# Altium PCB Audio_Meter_V3.2.PcbDoc (part 4 of 4)
Units mil, origin at the board's own origin, x right, y up, seen from the top; angles counter-clockwise.
Board outline 2756.14 x 2519.69 mil, 2 copper layers (Top Layer, Bottom Layer), stack 57 mil thick; 102 components, 57 nets, 306 pads, 131 vias.
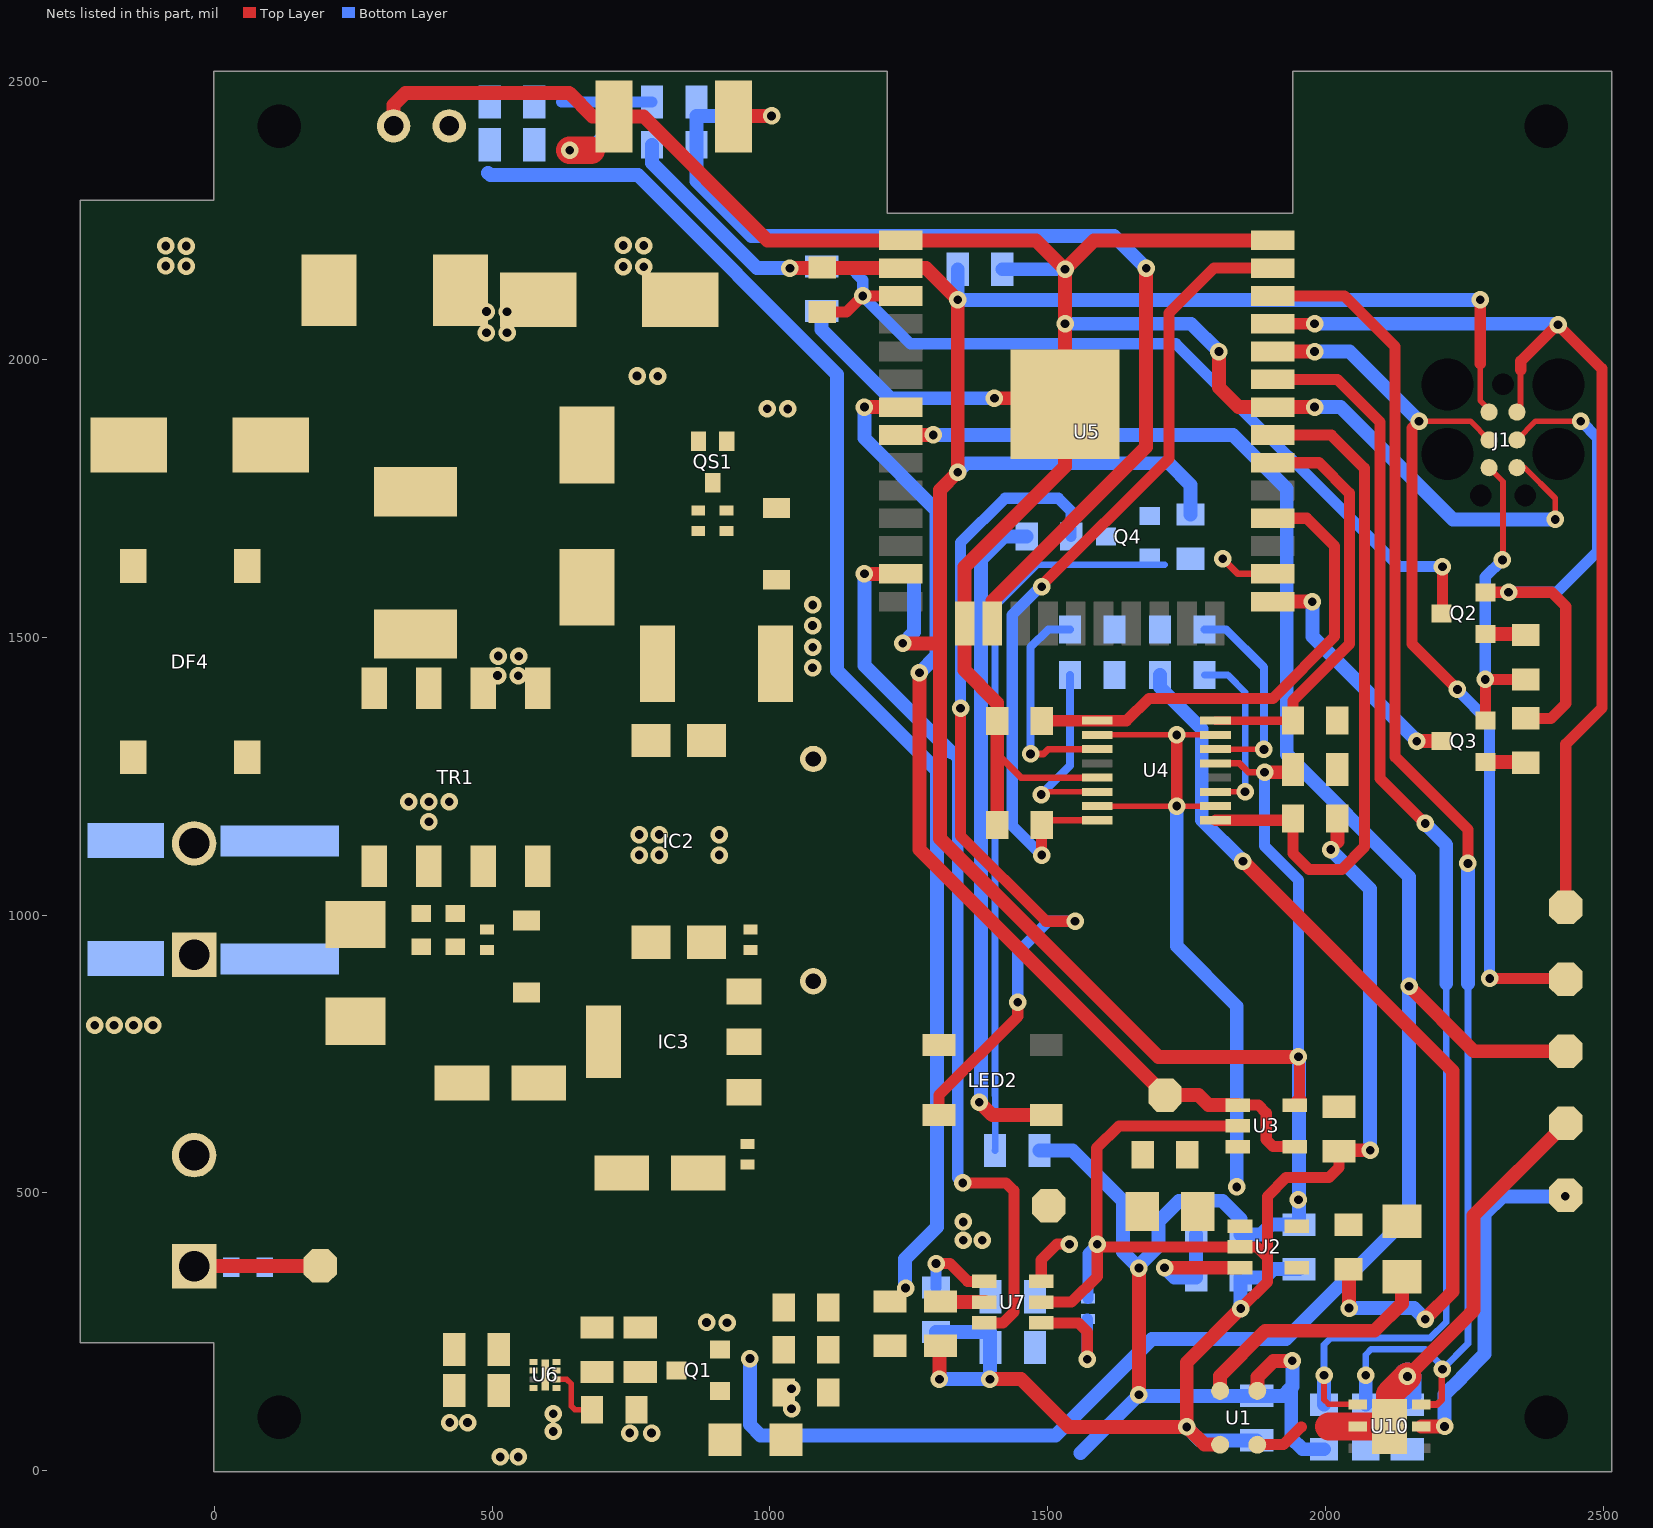
[diagram p2: the nets of this part, all layers, seen from the top]

## Part data (continued)
SW2: library part KSS221GLFS, "Tactile Switch SPST-NO Side Actuated Surface Mount, Right Angle", Contact Current Rating=50mA, Contact Resistance=100mR, Insulation Resistance=1GR, IP Rating=IP40, Manufacturer="ITT C&K", Max Operating Temperature=85°C, Max Voltage Rating (DC)=32V, Min Operating Temperature=-40°C, Operating Force=2N, Package Quantity=1, Power Rating=1W, Supplier Part Number 1=401-1097-6-ND, Actuator Length=0.8mm, ComponentLink1Description=https://datasheet.ciiva.com/26917/getdatasheetpartid-773364-26917575.pdf, ComponentLink1URL=https://datasheet.ciiva.com/26917/getdatasheetpartid-773364-26917575.pdf, ComponentLink2Description=https://datasheet.ciiva.com/30466/0900766b8129cd37-30466697.pdf, ComponentLink2URL=https://datasheet.ciiva.com/30466/0900766b8129cd37-30466697.pdf, ComponentLink3Description=https://datasheet.ciiva.com/16496/kss221g20lfs-16496166.pdf, ComponentLink3URL=https://datasheet.ciiva.com/16496/kss221g20lfs-16496166.pdf, ComponentLink4Description=https://datasheet.ciiva.com/18145/getdatasheetpartid-313005-18145235.pdf, ComponentLink4URL=https://datasheet.ciiva.com/18145/getdatasheetpartid-313005-18145235.pdf, ComponentLink5Description=https://datasheet.ciiva.com/16155/kss221glfs-ckcomponents-16155741.pdf, ComponentLink5URL=https://datasheet.ciiva.com/16155/kss221glfs-ckcomponents-16155741.pdf, ComponentLink6Description=https://datasheet.ciiva.com/5684/19445-5684460.pdf, ComponentLink6URL=https://datasheet.ciiva.com/5684/19445-5684460.pdf, ComponentLink7Description=https://datasheet.ciiva.com/2900/kss-2900345.pdf, ComponentLink7URL=https://datasheet.ciiva.com/2900/kss-2900345.pdf, ComponentLink8Description=https://datasheet.ciiva.com/2900/kss-2900343.pdf, ComponentLink8URL=https://datasheet.ciiva.com/2900/kss-2900343.pdf, ComponentLink9Description=https://datasheet.ciiva.com/7986/19445-7986997.pdf, ComponentLink9URL=https://datasheet.ciiva.com/7986/19445-7986997.pdf, ComponentLink10Description=https://datasheet.ciiva.com/2900/kss-2900344.pdf, ComponentLink10URL=https://datasheet.ciiva.com/2900/kss-2900344.pdf, Contact Material=Silver, Contact Plating=Silver, Current Rating=50mA, Depth=4.4mm, Illumination Type=Non-Illuminated,Illuminated, Lead Free="Lead Free", Length=4.5mm, Manufacturer Part Number=KSS221GLFS, Max Current Rating=50mA, Mechanical Life=100000Cycles, Mount="Surface Mount", Orientation="Right Angle", Packaging="Tape and Reel", Pricing 1="1=0.68, 10=0.655, 25=0.6424, 50=0.6182, 100=0.5334, 250=0.4849, 500=0.4607, 1000=0.3637 (USD)", Radiation Hardening=No, REACH SVHC="No SVHC", Stock 1=17242, Supplier 1=Digi-Key, Switch Function=Off-Mom, Switch Travel=0.3mm, Termination="Gull Wing", Throw Configuration=SPST, Voltage Rating (DC)=32V, Width=7mm
TR1: "FLYBACK TRANSFORMER WE-FB", Frequency=300kHz, Manufacturer="Wurth Electronics Midcom", Max Operating Temperature=125°C, Min Operating Temperature=-40°C, Package Quantity=300, Supplier Part Number 1=1297-1004-1-ND, Category=Transformers, ComponentLink1Description=https://datasheet.ciiva.com/18573/750311558-18573660.pdf?src-supplier=Digi-Key, ComponentLink1URL=https://datasheet.ciiva.com/18573/750311558-18573660.pdf?src-supplier=Digi-Key, Height - Seated (Max)=10.54mm, Length=9.78mm, Manufacturer Part Number=750311558, Mount="Surface Mount", Packaging="Tape and Reel", Pricing 1="1=6.21000, 10=6.13300, 50=5.74900, 100=5.17400 (USD)", RoHS=Yes, Stock 1=478, Supplier 1=Digi-Key, Width=9.14mm
U1: "SPU-TOP MIC IOT FOCUSED MIC", Manufacturer=Knowles, Operating Supply Current=250uA, Operating Supply Voltage=3.6V, Package Quantity=1200, Supplier Part Number 1=423-1138-1-ND, ComponentLink1Description=https://media.digikey.com/pdf/Data%20Sheets/Knowles%20Acoustics%20PDFs/SiSonic_Design_Guide.pdf?src-supplier=Mouser, ComponentLink1URL=https://media.digikey.com/pdf/Data%20Sheets/Knowles%20Acoustics%20PDFs/SiSonic_Design_Guide.pdf?src-supplier=Mouser, ComponentLink2Description=https://media.digikey.com/pdf/Data%20Sheets/Knowles%20Acoustics%20PDFs/SiSonic_Design_Guide.pdf?src-supplier=Digi-Key, ComponentLink2URL=https://media.digikey.com/pdf/Data%20Sheets/Knowles%20Acoustics%20PDFs/SiSonic_Design_Guide.pdf?src-supplier=Digi-Key, Depth=1.2mm, Direction=Omnidirectional, Height=1.2mm, Impedance=300R, Length=3.76mm, Manufacturer Part Number=SPU0410HR5H-PB, Output Type=Analog, Packaging="Tape and Reel", Pricing 1="1=0.82, 10=0.688, 25=0.6376, 50=0.6006, 100=0.5649, 500=0.48696 (USD)", Shape=Rectangular, Signal to Noise Ratio (SNR)=59dB, Stock 1=83682, Supplier 1=Digi-Key, Termination=SMD/SMT, Voltage Rating=3.6V, Width=2.95mm
U2 U3: "IC OPAMP GP 1 CIRCUIT SOT23-5", Case/Package=SOT-23, Input Bias Current=10pA, Input Offset Voltage (Vos)=1mV, Manufacturer="Texas Instruments", Max Operating Temperature=85°C, Max Supply Voltage=5.5V, Min Operating Temperature=-40°C, Min Supply Voltage=2.7V, Nominal Supply Current=250uA, Output Current per Channel=15mA, Package Quantity=250, Power Supply Rejection Ratio (PSRR)=90.46dB, Quiescent Current=250mA, Supplier Part Number 1=OPA344NACT-ND, Voltage Gain=122dB, Bandwidth=1MHz, Common Mode Rejection Ratio=76dB, ComponentLink1Description=http://www.ti.com/general/docs/lit/getliterature.tsp?genericPartNumber=OPA344&fileType=pdf&src-supplier=Newark, ComponentLink1URL=http://www.ti.com/general/docs/lit/getliterature.tsp?genericPartNumber=OPA344&fileType=pdf&src-supplier=Newark, ComponentLink2Description=http://www.farnell.com/datasheets/1882856.pdf?src-supplier=Element14, ComponentLink2URL=http://www.farnell.com/datasheets/1882856.pdf?src-supplier=Element14, ComponentLink3Description=http://www.ti.com/lit/ds/symlink/opa344.pdf?src-supplier=Digi-Key, ComponentLink3URL=http://www.ti.com/lit/ds/symlink/opa344.pdf?src-supplier=Digi-Key, ComponentLink4Description=http://focus.ti.com/lit/ds/symlink/opa344.pdf?src-supplier=Avnet+Europe, ComponentLink4URL=http://focus.ti.com/lit/ds/symlink/opa344.pdf?src-supplier=Avnet+Europe, ComponentLink5Description=http://www.ti.com/general/docs/lit/getliterature.tsp?genericPartNumber=OPA4345&&fileType=pdf&src-supplier=Avnet, ComponentLink5URL=http://www.ti.com/general/docs/lit/getliterature.tsp?genericPartNumber=OPA4345&&fileType=pdf&src-supplier=Avnet, Gain Bandwidth Product=1MHz, Height=1.15mm, Lead Free="Lead Free", Length=2.9mm, Manufacturer Part Number=OPA344NA/250, Max I/O Voltage=1mV, Number of Amplifiers=1, Number of Channels=1, Number of Circuits=1, Number of Elements=1, Number of Pins=5, Packaging="Tape and Reel", Pricing 1="1=1.59, 10=1.43, 25=1.3492, 100=1.0794 (USD)", Radiation Hardening=No, REACH SVHC="No SVHC", Slew Rate=0.8V/µs, Stock 1=6132, Supplier 1=Digi-Key, Unity Gain Bandwidth Product=1MHz, Width=1.6mm
U4: "IC SWITCH QUAD SPST 16TSSOP", Case/Package=TSSOP, High Level Output Current=30mA, Manufacturer="Analog Devices", Max Operating Temperature=85°C, Max Power Dissipation=5uW, Max Supply Current=1uA, Max Supply Voltage=5.5V, Min Operating Temperature=-40°C, Min Supply Voltage=1.8V, On-State Resistance=4R, Operating Supply Current=1nA, Package Quantity=1, Power Dissipation=430mW, Supplier Part Number 1=ADG712BRUZ-REELCT-ND, -3db Bandwidth=200MHz, Bandwidth=200MHz, ComponentLink1Description=http://www.analog.com/media/en/technical-documentation/data-sheets/ADG711_712_713.pdf?src-supplier=Digi-Key, ComponentLink1URL=http://www.analog.com/media/en/technical-documentation/data-sheets/ADG711_712_713.pdf?src-supplier=Digi-Key, ComponentLink2Description=http://datasheet.iiic.cc/analog_devices/ADG712BRUZ-REEL.pdf?src-supplier=IIIC, ComponentLink2URL=http://datasheet.iiic.cc/analog_devices/ADG712BRUZ-REEL.pdf?src-supplier=IIIC, Contact Plating=Tin,Matte, Interface=Parallel, Lead Free="Contains Lead", Manufacturer Part Number=ADG712BRUZ-REEL, Mount="Surface Mount", Number of Bits=4, Number of Channels=4, Number of Circuits=4, Number of Inputs=4, Number of Outputs=4, Number of Pins=16, Packaging="Tape and Reel", Polarity=Non-Inverting, Pricing 1="1=2.89, 10=2.598, 25=2.4564, 100=2.129, 250=2.01984, 500=1.81238, 1000=1.52852 (USD)", Stock 1=4085, Supplier 1=Digi-Key, Supply Type=Single, Throw Configuration=SPST, Turn-Off Delay Time=6ns, Turn-On Delay Time=11ns
U5: "WIFI MODULE 128MBITS SPI FLASH", Case/Package=SMD/SMT, Frequency=2.5GHz, Manufacturer="Espressif Systems", Manufacturer Part Number=ESP32-WROOM-32D(16MB), Max Operating Temperature=85°C, Min Operating Temperature=-40°C, Supplier Part Number 1=356-ES32WROOM32D16MB, ComponentLink1Description=https://www.espressif.com/sites/default/files/documentation/esp32-wroom-32d_esp32-wroom-32u_datasheet_en.pdf?src-supplier=Digi-Key, ComponentLink1URL=https://www.espressif.com/sites/default/files/documentation/esp32-wroom-32d_esp32-wroom-32u_datasheet_en.pdf?src-supplier=Digi-Key, Data Rate=150Mbps, Interface=I2C,SPI,GPIO,PWM,SDIO,UART, Memory Size=536KB, Mount="Surface Mount", Packaging="Tape and Reel", Pricing 1="1=4.5, 5=4.5 (USD)", Sensitivity=-98dBm, Stock 1=3620, Supplier 1=Mouser
U6: "IC REG LINEAR 3.3V 1A 8XDFN", Dropout Voltage=95mV, Manufacturer="ON Semiconductor", Max Operating Temperature=125°C, Min Current Limit=1.1A, Min Operating Temperature=-40°C, Output Current=1A, Output Voltage=3.3V, Supplier Part Number 1=NCP186AMX330TAGOSCT-ND, ComponentLink1Description=http://www.farnell.com/datasheets/2236905.pdf?src-supplier=Farnell, ComponentLink1URL=http://www.farnell.com/datasheets/2236905.pdf?src-supplier=Farnell, ComponentLink2Description=http://www.farnell.com/datasheets/2236905.pdf?src-supplier=Newark, ComponentLink2URL=http://www.farnell.com/datasheets/2236905.pdf?src-supplier=Newark, ComponentLink3Description=http://www.onsemi.com/pub/Collateral/NCP186-D.PDF?src-supplier=Digi-Key, ComponentLink3URL=http://www.onsemi.com/pub/Collateral/NCP186-D.PDF?src-supplier=Digi-Key, ComponentLink4Description=https://www.onsemi.com/pub/Collateral/NCP186-D.PDF?src-supplier=Digi-Key, ComponentLink4URL=https://www.onsemi.com/pub/Collateral/NCP186-D.PDF?src-supplier=Digi-Key, Lead Free="Lead Free", Manufacturer Part Number=NCP186AMX330TAG, Mount="Surface Mount", Number of Pins=8, Number of Regulators=1, Packaging="Tape and Reel", Pricing 1="1=0.48, 10=0.39, 25=0.3564, 100=0.2405, 250=0.199, 500=0.18242, 1000=0.13682 (USD)", Stock 1=5995, Supplier 1=Digi-Key
U7: "IC BAT CHG LI-ION 1 CELL SOT23-6", Battery Pack Voltage=4.2V, Case/Package=SOT-23-6, Manufacturer="Texas Instruments", Max Charge Current=800mA, Max Operating Temperature=125°C, Max Supply Voltage=6.45V, Min Operating Temperature=0°C, Supplier Part Number 1=296-47315-1-ND, ComponentLink1Description=http://www.ti.com/lit/ds/symlink/bq21040.pdf?src-supplier=Digi-Key, ComponentLink1URL=http://www.ti.com/lit/ds/symlink/bq21040.pdf?src-supplier=Digi-Key, ComponentLink2Description=http://www.ti.com/general/docs/suppproductinfo.tsp?distId=10&gotoUrl=http%3A%2F%2Fwww.ti.com%2Flit%2Fgpn%2Fbq21040&src-supplier=Digi-Key, ComponentLink2URL=http://www.ti.com/general/docs/suppproductinfo.tsp?distId=10&gotoUrl=http%3A%2F%2Fwww.ti.com%2Flit%2Fgpn%2Fbq21040&src-supplier=Digi-Key, ComponentLink3Description=http://www.ti.com/general/docs/suppproductinfo.tsp?distId=10&amp;gotoUrl=http%3A%2F%2Fwww.ti.com%2Flit%2Fgpn%2Fbq21040&src-supplier=Digi-Key, ComponentLink3URL=http://www.ti.com/general/docs/suppproductinfo.tsp?distId=10&amp;gotoUrl=http%3A%2F%2Fwww.ti.com%2Flit%2Fgpn%2Fbq21040&src-supplier=Digi-Key, Differential Output=No, Fault Protection="Over Voltage,Over Temperature,Short Circuit", Interface=USB,SPI, Lead Free="Lead Free", Manufacturer Part Number=BQ21040DBVR, Mount="Surface Mount", Number of Bits=16, Number of Cells=1, Number of D/A Converters=4, Output Type="Analog Current/Voltage", Packaging="Cut Tape", Pricing 1="1=1.14, 10=1.015, 100=0.7396, 500=0.61924, 1000=0.48163 (USD)", Settling Time=30us, Stock 1=5958, Supplier 1=Digi-Key
U10: "SENS HUMID/TEMP 3.6V I2C 2% 6DFN", Manufacturer="Silicon Labs", Max Operating Temperature=85°C, Min Operating Temperature=-40°C, Supplier Part Number 1=336-4380-1-ND, Accuracy=3%, ComponentLink1Description=https://www.silabs.com/Support%20Documents/TechnicalDocs/Si7021-A20.pdf?src-supplier=Avnet, ComponentLink1URL=https://www.silabs.com/Support%20Documents/TechnicalDocs/Si7021-A20.pdf?src-supplier=Avnet, ComponentLink2Description=https://www.silabs.com/documents/public/data-sheets/Si7021-A20.pdf?src-supplier=Newark, ComponentLink2URL=https://www.silabs.com/documents/public/data-sheets/Si7021-A20.pdf?src-supplier=Newark, ComponentLink3Description=https://www.silabs.com/Support%20Documents%2fTechnicalDocs%2fSi7021-A20.pdf?src-supplier=Digi-Key, ComponentLink3URL=https://www.silabs.com/Support%20Documents%2fTechnicalDocs%2fSi7021-A20.pdf?src-supplier=Digi-Key, ComponentLink4Description=https://www.silabs.com/Support%20Documents/TechnicalDocs/Si7021-A20.pdf?src-supplier=Avnet+Asia, ComponentLink4URL=https://www.silabs.com/Support%20Documents/TechnicalDocs/Si7021-A20.pdf?src-supplier=Avnet+Asia, ComponentLink5Description=https://www.silabs.com/documents/public/data-sheets/Si7021-A20.pdf?src-supplier=Digi-Key, ComponentLink5URL=https://www.silabs.com/documents/public/data-sheets/Si7021-A20.pdf?src-supplier=Digi-Key, ComponentLink6Description=https://www.silabs.com/documents/public/data-sheets/Si7021-A20.pdf?src-supplier=Farnell, ComponentLink6URL=https://www.silabs.com/documents/public/data-sheets/Si7021-A20.pdf?src-supplier=Farnell, Manufacturer Part Number=SI7021-A20-GM1R, Mount="Surface Mount", Output Type=I2C,Digital, Pricing 1="1=3.37, 25=3.2436, 100=3.2313 (USD)", Response Time=18s, Sensor Type=Temperature, Stock 1=8770, Supplier 1=Digi-Key

## Free pads (board coordinates)
  round 60 hole 78.74 unplated: MH2(117.11,96.43) MH3(117.11,2419.26) MH3(2396.87,96.43) MH3(2396.87,2419.26)

## Via types
v1: diameter 31.5, hole 15.75, Top Layer to Bottom Layer, 72 vias
v2: diameter 31.5, hole 15.75, Top Layer to Bottom Layer, tented both sides, 59 vias

## Nets (pads, with @x,y where several pads share a name; then routed paths per layer and width w, separated by ;. In a path a pad name is that pad's centre, name@x,y a point inside that pad or via, vN(x,y) a via of type N, cw(c..) or ccw(c..) an arc to the next point about the centre after c; other vN are vias at no path point)
3V3: C1.1 C2.1 C3.1 C4.1 C7.1 C12.1 C13.1 C22.1 C76.2 J1.1 P4.1 Q4.1 R2.2 R4.2 R5.2 R24.2 R43.2 R56.1 RC1.2 U1.1 U2.5 U3.5 U4.13 U5.2 U6.1 U6.2 U6.4 U10.5 | length 7769.1
  Top Layer w10: 2278,1992 2277.75,1991.75 2277.75,1926.25 2294,1910 J1.1@2294,1905
  Top Layer w12: U4.13@1801.65,1273.02 1844.98,1273.02 1861,1257 v2(1890,1257)
  Top Layer w20: U3.5@1953,667.08 v2@1953,745 ; 2278,1992 v2(2278,2107)
  Top Layer w25: v2(1036,2164) U5.2@1235.35,2164 1281,2164 v2(1338,2107) v1(1338,1797) 1306,1765 1306,1488 ; v1(1239,1489) 1305,1489 1306,1488 ; v2(1664,137) v2(1664,365) ; 1793,745 1699,745 1306,1138 1306,1488 ; 1796,745 v2(1951,745) ; U1.1@1875.82,151.47 1875.82,145.18 U1.1@1877,144 1877,169 1906,198 v2(1940,198) ; v2(1890,1257) 1936,1257 C1.1@1941,1262 ; U3.5@1944.18,658.26 U3.5@1953,667.08 ; U10.5@2172.17,80 v1(2214,80)
  Bottom Layer w20: v2@1890,1255 1890,1124 1951,1063 v2(1951,745)
  Bottom Layer w25: R24.2@788,2386 788,2353 977,2164 v2(1036,2164) ; v1(1239,1489) 1259.5,1509.5 RC1.2@1259.5,1615 ; v1(1338,1797) 1354,1813 1718,1813 1757,1774 R56.1@1757,1721 ; C22.1@1338,2162 v2(1338,2107) v2(2278,2107) ; C76.2@1485,576.37 1544.63,576.37 1635,486 1635,394 v2(1664,365) 1664,369.45 1699,404.45 1699,449 1736,486 1814,486 1847,453 R2.2@1847,425 1884,425 1902,443 C3.1@1952,443 v2@1952,488 ; 1559,32 v2(1664,137) 1666,135 C4.1@1876,135 1923,135 1938,150 ; v2(1940,198) 1940,152 1938,150 ; v2(1951,488) v2@1952,488 ; v2@1952,744 v2@1952,488 ; R4.2@1997,39 1958,39 1938,59 1938,150 ; v1(2214,80) 2214,137.15 2245.25,168.4 2245.25,169.25 2286,210 2286,462 2318,494 v1(2431,494)
  other v1: 515,25 547,25
#12-P: R8.2 U4.1 U5.28 | length 885
  Top Layer w20: R8.2@1489,1349 1489.8,1349.8 U4.1@1589.05,1349.8 1641.8,1349.8 1682,1390 1905,1390 2016,1501 2016,1664 1966,1714 U5.28@1904.65,1714
#12-S: R7.1 U4.3 | length 402.7
  Top Layer w12: v2(1469,1290) 1492.39,1290 1501,1298.61 U4.3@1589.05,1298.61
  Bottom Layer w12: v2(1469,1290) v2@1471,1292
  Bottom Layer w15: v2(1469,1290) 1469,1482 1501,1514 R7.1@1540,1514
#13-P: R10.2 U4.16 U5.30 | length 751.8
  Top Layer w15: U4.16@1801.65,1349.8 1940.8,1349.8 R10.2@1941,1350
  Top Layer w20: U5.30@1904.65,1814 1988,1814 2043,1759 2043,1488 1941,1386 R10.2@1941,1350
#13-S: R9.1 U4.14 | length 372.5
  Top Layer w10: U4.14@1799.65,1298.61 v2@1889,1298.61
  Bottom Layer w15: R9.1@1782,1514 1821,1514 1889,1446 v2(1889,1298)
#14-P: R12.2 U4.9 U5.31 | length 1232.9
  Top Layer w20: U4.9@1801.65,1170.66 1937.66,1170.66 R12.2@1941,1174 1941,1111 1970,1082 2029,1082 2070,1123 2070,1804 2010,1864 U5.31@1904.65,1864
#14-S: R11.1 U4.11 | length 318.4
  Top Layer w10: U4.11@1801.65,1221.84 v2(1855,1221.84)
  Bottom Layer w12: R11.1@1782,1432 1824,1432 1855,1401 v2(1855,1221.84)
#15-P: R14.2 U4.8 U5.37 | length 1491.6
  Top Layer w12: R14.2@1497.66,1170.66 U4.8@1589.05,1170.66
  Top Layer w20: v2@1488,1592 1718,1822 1718,2083 1799,2164 U5.37@1904.65,2164 ; v2(1489,1108) R14.2@1489,1162 R14.2@1497.66,1170.66
  Bottom Layer w20: v2@1488,1592 1435.98,1539.98 1435.98,1161.02 v2(1489,1108)
  other v2: 1489,1591
#15-S: R13.1 U4.6 | length 339.6
  Top Layer w10: v2(1488,1217) 1492.84,1221.84 U4.6@1589.05,1221.84
  Bottom Layer w15: v2(1488,1217) 1540,1269 R13.1@1540,1432
#_OUT_MIC: R1.2 R7.2 R9.2 R11.2 R13.2 U2.4 | length 1613
  Top Layer w25: v2(1851,1097) 2228.63,719.37 2228.63,322.63 v2(2179,273) ; v2(2042,293) R1.2@2042,365
  Bottom Layer w25: R11.2@1702,1432 1702,1410 1777,1335 1777,1171 v2(1851,1097) ; v2@2044,293 2159,293 v2(2179,273)
#O_MIC: P9.1 U3.1 U3.4 U5.7 | length 1852.8
  Top Layer w20: U3.1@1841.82,658.26 1878.74,658.26 1893,644 1893,596 1905.55,583.45 U3.4@1944.18,583.45
  Top Layer w25: v1(1170,1914) U5.7@1235.35,1914 ; v1(1269,1436) 1269,1118 P9.1@1711,676 1771,676 1788.74,658.26 U3.1@1841.82,658.26
  Bottom Layer w25: v1(1170,1914) 1170,1858 1300,1728 1300,1467 v1(1269,1436)
#OUT_MIC: C9.1 U2.1 U4.2 U4.7 U4.10 U4.15 | length 1283.1
  Top Layer w10: U4.7@1589.05,1196.25 v2(1732,1196.25) U4.10@1801.65,1196.25 ; U4.2@1589.05,1324.2 v2(1732,1324.2) U4.15@1801.65,1324.2
  Top Layer w20: v2(1732,1196.25) v2(1732,1324.2)
  Bottom Layer w25: v2(1732,1196.25) 1732,944 1840,836 v2(1840,511)
AC1: CF8.2 J7.2 RF12.1
AC2: CF8.1 DF4.2 J7.1
B_ADC: P8.1 R32.1 R33.1 U5.8 | length 3940.9
  Top Layer w25: U5.8@1235.35,1864 v1(1294,1864) ; v1(2150,872) 2267,755 P8.1@2432,755
  Bottom Layer w25: v1(964,202) 964,83 983,64 1514,64 1687.6,237.6 1928.6,237.6 2150,459 v1(2150,872) 2150,1069 1930,1289 1930,1767 1833,1864 v1(1294,1864)
BATT_IN: C16.1 C17.1 C24.1 C26.1 J5.1 Q1.3 R32.2 U7.2 | length 2601
  Top Layer w25: C17.1@1307,306 1309.4,303.6 U7.2@1385.82,303.6
  Bottom Layer w25: 493,2335.5 497,2331.5 762.5,2331.5 1121,1973 1121,1440 1301,1260 1301,439 1243,381 1243,330 v1(1244,329)
BR#: DF4.4 RF12.2
  other v1: -215,802 -180,802 -145,802 -110,802
BYP#: CF7.1 D3.2 RF7.1
CHG: RC1.1 U5.13 U7.3 | length 1611.9
  Top Layer w20: v1(1347,518) 1425,518 1439,504 1439,286 1419.2,266.2 U7.3@1385.82,266.2
  Top Layer w25: v1(1170,1614) U5.13@1235.35,1614
  Bottom Layer w20: 1325.5,1293.5 1338,1281 1338,527 v1(1347,518)
  Bottom Layer w25: v1(1170,1614) 1170,1449 1325.5,1293.5
DTR: J1.5 Q3.2 RC2.1 | length 551.8
  Top Layer w10: J1.5@2294,1805 2319,1780 2319,1640 v2(2318,1639)
  Top Layer w20: Q3.2@2287.37,1350.4 2287.37,1424 RC2.1@2360,1424 RC2.1@2361,1424
  Bottom Layer w20: v2(2287,1424) 2287,1608 v2(2318,1639)
ENABLE: C78.1 Q2.3 R43.1 U5.3 | length 1596.5
  Top Layer w20: R43.1@1094,2085 1138,2085 v2(1167,2114) U5.3@1235.35,2114 ; Q2.3@2208.63,1543 2210,1544.37 v2(2210,1627) ; v2@2214,1627 v2@2214.63,1626.37
  Bottom Layer w20: C78.1@1093,2167 1143,2167 1167,2143 v2(1167,2114) 1253,2028 1731,2028 2132,1627 v2(2210,1627)
FB_: CF4.1 IC2.4 IC3.2
GND: C1.2 C2.2 C3.2 C4.2 C7.2 C10.2 C11.2 C12.2 C13.2 C16.2 C17.2 C18.2 C19.2 C22.2 C24.2 C25.2 C26.2 C78.2 CF3.2 CF9.2 IC2.2 J1.6 J5.2 J6.2 LED2.1 P5.1 R3.2 R8.1 R10.1 R12.1 R14.1 R26.1 R28.1 R29.1 R33.2 RF8.2 SW2.2 TR1.7 TR1.8 U1.2 U1.3 U2.2 U3.2 U4.5 U5.1 U5.15 U5.32 U5.38 U5.39 U6.5 U6.9 U7.5 U10.2 U10.7 | length 9590.2
  Top Layer w10: J1.6@2344,1805 2358,1805 2413,1750 v2(2413,1712)
  Top Layer w12: 1409,1286 1413,1286 1451.57,1247.43 U4.5@1589.05,1247.43
  Top Layer w20: U7.5@1488.18,303.6 1542.97,303.6 1589,349.63 v2(1589,408) ; U5.39@1520.31,1930 U5.39@1531,1919.31 ; U3.2@1841.82,620.86 1627.86,620.86 1588,581 1588,409 v2(1589,408) ; v2(1847,292) 1895,340 1895,384 ; U1.2@1877,47.15 1924.15,47.15 1956,79 ; C2.2@2024,575 2024,546 2006,528 1928.96,528 1895,494.04 1895,384 ; v2(1589,408) 1594,403 U2.2@1845.82,403 1876,403 1895,384
  Top Layer w25: J5.2@323,2420 323,2458 344,2479 639,2479 681,2437 SW2.2@719.7,2437 773,2437 996,2214 U5.1@1235.35,2214 1479,2214 v2(1531,2162) ; v2(1305,165) 1305,223 C17.2@1307,225 ; v2(1396,165) 1452,165 1538,79 v2(1750,79) ; v1(1404,1930) U5.39@1520.31,1930 ; R14.1@1409,1162 1409,1286 R8.1@1409,1349 1409,1382 1350.31,1440.69 U5.15@1350.31,1524.63 1350.31,1626.31 1531,1807 U5.39@1531,1919.31 v2(1531,2064) 1530,2065 1531,2066 v2(1531,2162) ; v2(1808,2014) 1808,1949 1843,1914 U5.32@1904.65,1914 v2(1980,1914) ; U1.3@1810.07,47.15 1781.85,47.15 v2(1750,79) ; v2(1847,292) 1750,195 v2(1750,79) ; U5.38@1904.65,2214 1583,2214 v2(1531,2162) ; 2021,1132.41 R12.1@2021,1174 ; C2.2@2024,575 2026,577 v2@2076,577 ; v1(2147,170) 2266,289 2266,459.5 P5.1@2432,625.5
  Top Layer w50: v2(640,2376) 678,2376 ; 2006,80 U10.2@2058,80 U10.7@2115.09,80 2115.09,138.09 v1(2147,170)
  Bottom Layer w20: 625,2463 C25.2@788,2463 ; R28.1@1572,310.5 1572,391 v2(1589,408)
  Bottom Layer w25: v2(640,2376) 675,2376 724,2425 ; C78.2@1093,2087 1093,2053.34 1216.34,1930 v1(1404,1930) ; R29.1@1299,250 1396,250 v2(1396,165) v2(1305,165) ; C22.2@1418,2162 v2@1530,2162 ; v2(1531,2064) 1758,2064 v2(1808,2014) ; v2(1750,79) 1774,55 C4.2@1876,55 ; v2@1847,293 R3.2@1847,348 1891,348 1906,363 C3.2@1952,363 ; v2(1980,1914) 2027,1914 2229,1712 v2(2413,1712) ; v2(2009,1118) 2080,1047 v2(2080,577)
  Bottom Layer w50: C7.2@2147,136 v1(2147,170)
  other v1: 610,71 424,87 456,87 610,103 510,1431 547,1430.7 511,1466 548,1465.7 995,1911 1032,1910.7 761,1970 798,1969.7
  other v2: 1348,415 1382,415 1348,448
GND_VAC: C5.2 CF3.1 CF4.2 CF7.2 CF10.2 CF11.2 DF4.3 IC2.3 IC3.4 TR1.1
  other v1: 764.7,1108 800.7,1108 908.7,1108 765,1145 801,1145 909,1145 736,2167 773,2166.7 -87,2168 -50,2167.7 -87,2204 -50,2203.7 736,2205 773,2204.7
IND#: CF10.1 DF4.1 L1.1
IO_0: Q3.3 U5.25 | length 447.1
  Top Layer w10: v2@2164,1311 v2@2166,1313
  Top Layer w25: U5.25@1904.65,1564 v2(1976,1564) ; v2@2166,1313 Q3.3@2208.63,1313
  Bottom Layer w25: v2(1976,1564) 1976,1501 v2(2164,1313) ; v2@2163,1312 v2@2164,1311
IO_4: LED2.2 Q4.3 R57.2 | length 1563.1
  Top Layer w20: LED2.2@1304.16,640.02 1304.16,676.16 1446,818 v1(1446,843) ; v1(1343,1372) 1343,1142.72 1496.72,989 v1(1549,989)
  Bottom Layer w20: v1(1343,1372) 1343,1670 1423,1750 1519,1750 1542,1727 R57.2@1542,1681 ; v1(1446,843) 1446,934 1501,989 v1(1549,989)
IO_4#: C76.1 Q4.2 R56.2 U5.26 | length 1416
  Top Layer w12: v1(1815,1641) 1842,1614 U5.26@1904.65,1614
  Bottom Layer w12: C76.1@1405,576.37 1405.25,576.61 1405.25,675.41 1405,675.66 1405,1554 1481.6,1630.6 1710.6,1630.6
ISET: R28.2 U7.4 | length 211
  Top Layer w20: U7.4@1488.18,266.2 1554.8,266.2 1571,250 v2(1571,201)
  Bottom Layer w20: v2(1571,201) R28.2@1571,273.5
NetC8_2: C8.2 R1.1
NetC9_2: C9.2 R6.2
NetCF1_1: CF1.1 D1.2 RF2.2
NetD2_1: D2.1 QS1.3 RF8.1 RF11.1
NetD3_1: D3.1 RF6.2
NetQ2_1: Q2.1 RC2.2 | length 68.3
  Top Layer w10: RC2.2@2359.4,1505.6 RC2.2@2361,1504
  Top Layer w25: Q2.1@2293.37,1505.6 RC2.2@2359.4,1505.6
NetQ3_1: Q3.1 RC3.2 | length 73.3
  Top Layer w10: RC3.2@2358.4,1275.6 RC3.2@2360,1274
  Top Layer w25: Q3.1@2287.37,1275.6 RC3.2@2358.4,1275.6
NetR2_1: R2.1 R3.1 U2.3 | length 277.1
  Top Layer w25: v2(1710,365.6) U2.3@1845.82,365.6
  Bottom Layer w25: v2(1710,365.6) 1727.6,348 R3.1@1767,348 R2.1@1767,425
NetR6_1: R6.1 U3.3
NetR39_1: R39.1 U6.6 | length 109.9
  Top Layer w10: U6.6@616.34,164.75 634.51,164.75 642.67,156.59 642.67,116.33 649,110 R39.1@680,110
OPT_: IC2.1 RF11.2
OUT_MIC: C8.1 U1.4 | length 455.8
  Top Layer w25: U1.4@1810.07,144 1810.07,171.07 1891.16,252.16 2088.16,252.16 2137,301 C8.1@2137,349
PRI_1: CF1.2 CF11.1 L1.2 RF2.1 TR1.3
  other v1: 386.5,1168 350,1204 386.5,1204 423,1204 490,2048 527,2047.7 490,2086 527,2085.7
PRI_2: D1.1 IC3.3 TR1.4
PRI_3: RF6.1 TR1.2
PRI_4: DF1.1 TR1.5 TR1.6
PW_: C5.1 IC3.1 RF7.2
QOUT: CF9.1 DF1.2 QS1.2 RF10.1
RTS: J1.4 Q2.2 RC3.1 | length 1017.9
  Top Layer w10: J1.4@2344,1855 2377.75,1888.75 v2(2459,1888.75) v2@2468,1888.75
  Top Layer w20: v2@2329,1580.4 2293.37,1580.4 2293.97,1581 v2(2329,1581) 2406,1581 2432,1555 2432,1381 2405,1354 RC3.1@2360,1354
  Bottom Layer w20: v2(2329,1581) 2416,1581 2489,1654 2489,1858.75 v2(2459,1888.75)
RX: J1.3 P7.1 U5.34 | length 1658.8
  Top Layer w10: v2(2168,1888.75) 2260.25,1888.75 J1.3@2294,1855 ; P7.1@2430.5,886 P7.1@2432,884.5
  Top Layer w20: v2(2168,1888.75) 2155.25,1876 2155.25,1487.75 v2(2237,1406) ; v2(2295,886) P7.1@2430.5,886
  Top Layer w25: U5.34@1904.65,2014 v2(1980,2014)
  Bottom Layer w20: v2(2237,1406) 2237,1405 2295,1347 v2(2295,886)
  Bottom Layer w25: v2(1980,2014) 2042.75,2014 v2(2168,1888.75)
SCL_: R5.1 U5.36 U10.6 | length 2519.2
  Top Layer w12: U10.6@2172.17,119.37 2200.37,119.37 2209,128 2209,184 v1(2210,183)
  Top Layer w20: U5.36@1904.65,2114 2034,2114 2125,2023 2125,1285 2256,1154 v2(2256,1093)
  Bottom Layer w12: v1(2072,172) 2072,209 2082,219 2179,219 2210,188 v1(2210,183) 2256,229 2256,877
  Bottom Layer w25: R5.1@2072,119 v1(2072,172) ; 2256,877 v2(2256,1093)
SDA_: R4.1 U5.33 U10.1 | length 2347.2
  Top Layer w10: v1(1997,172) 1997,128 2005,120 2058,120 U10.1@2058,119.37
  Top Layer w20: U5.33@1904.65,1964 2021,1964 2098,1887 2098,1246 v2(2179,1165)
  Bottom Layer w12: v1(1997,172) 1997,227 2009,239 2188,239 2217,268 2217,877
  Bottom Layer w25: R4.1@1997,119 v1(1997,172) ; v2@2178.5,1164.5 2217,1126 2217,877
SOFT_P: C25.1 R24.1 SW2.1 U5.16 | length 1949.1
  Top Layer w25: SW2.1@934.3,2437 935.3,2438 v2(1003,2438) ; U5.16@1400.31,1524.63 1400.31,1565.31 1677,1842 v2(1677,2164)
  Bottom Layer w25: v2(1003,2438) 868,2438 R24.1@868,2386 868,2321 967,2222 1619,2222 v2(1677,2164)
TS: R29.2 U7.1 | length 140.1
  Top Layer w20: v2@1302,373 1324,373 1356,341 U7.1@1385.82,341
  Bottom Layer w20: R29.2@1299,330 v2(1299,373)
TX: J1.2 P6.1 U5.35 | length 1810.1
  Top Layer w10: J1.2@2344,1905 2350.51,1911.51 2350.51,1980.51 2351,1981
  Top Layer w20: U5.35@1904.65,2064 v2(1980,2064) ; 2351,1981 2351,1997 v2@2417,2063 ; v2(2418,2062) 2497,1983 2497,1373 2432,1308 P6.1@2432,1014
  Bottom Layer w10: v2@2416,2064 v2(2418,2062)
  Bottom Layer w25: v2(1980,2064) v2@2416,2064
VBUS: C18.1 C19.1 D4.A LED2.3 P2.1 Q1.1 R26.2 R57.1 SB1.1 U7.6 | length 1309.6
  Top Layer w20: U7.6@1488.18,341 1488.18,379.18 1517,408 v2(1539,408)
  Top Layer w25: v1(1376.5,663.5) 1399.98,640.02 LED2.3@1497.07,640.02 LED2.3@1496.09,641
  Bottom Layer w25: v1(1376.5,663.5) 1379.5,666.5 1379.5,1639.5 1421,1681 R57.1@1462,1681
  other v1: 1039,112 1039,148
VIN: C10.1 C11.1 D4.K Q1.2 R39.2 U6.7 U6.8
  other v1: 748,68 787,68 886,267 923,266.7
VOUT: D2.2 J6.1 P18.1 QS1.1 RF10.2 SB1.2 | length 227.4
  Top Layer w25: J6.1@-36,368 -35,369 P18.1@191,369
  other v1: 1076.7,1445 1077,1482 1076.7,1521 1077,1558
pads on no net: J1.MP1 J1.MP2 J1.MP3 J1.MP4 J1.MP5 J1.MP6 J1.MP7 LED2.4 U4.4 U4.12 U5.4 U5.5 U5.6 U5.9 U5.10 U5.11 U5.12 U5.14 U5.17 U5.18 U5.19 U5.20 U5.21 U5.22 U5.23 U5.24 U5.27 U5.29 U6.3 U10.3 U10.4

## Polygon pours and split planes (outlines as drawn)
GND on Bottom Layer "Bottom Layer-GND" (hatched 45Degree grid 20 track 8, pour order 0): 50,2487 1211,2487 1211,2263 1941,2263 1941,2487 2476,2487 2476,25 50,25 50,268 -211,268 -211,2255 50,2255

## Other copper
Top Layer:
  rectangle net GND: 933,1977 1007,2264
  rectangle net PRI_1: 366,2255 679,2335
  rectangle net GND: 1210,398 1419,486
  rectangle net GND: 558,295 820,375
  rectangle net GND: 558,365.6 1186,387
  rectangle net GND: 168,5 444,168
  rectangle net GND: -125,239 73,315
  rectangle net GND: -237,239 -85,433
  rectangle net GND: 7,146 428,316
  rectangle net BATT_IN: 1074,314 1267,340
  rectangle net GND: 1169,739 1339,811
  rectangle net GND: 1166,365 1244,1246
  rectangle net GND_VAC: 1041,787 1158,971
  rectangle net GND_VAC: 703,2015 922.59,2233
  rectangle net GND: 702,1888.75 1100,2003
  rectangle net BATT_IN: 837,176 861,339
  rectangle net VIN: 868,178 940,330
  rectangle net BATT_IN: 811,95 853,216
  rectangle net BATT_IN: 828,337 1267,358
  rectangle net BATT_IN: 828,161 852,345
  rectangle net 3V3: 482,4 582,118
  rectangle net GND: 589.67,200 602,292
  rectangle net VIN: 610,178 803,216
  rectangle net GND: 406,265 820,317
  rectangle net GND: 406,5 473,298
  rectangle net GND: 596,223 820,292
  rectangle net VIN: 748,3 964,87
  rectangle net VIN: 729,3 803,164
  rectangle net VIN: 656,154 803,200
  rectangle net VBUS: 989,2 1063,116
  rectangle net VBUS: 862,96 1063,168
  rectangle net B_ADC: 947,182 1063,330
  rectangle net GND: 1521,3 2028,108
  rectangle net GND: 1075,3 1536,246
  rectangle net BATT_IN: 1074,259 1340,332
  rectangle net GND: 951,1233 1244,1360
  rectangle net GND_VAC: -229,1527 -11,2273
  rectangle net IND#: 24,1526 200,1972
  rectangle net IND#: 23,1958 290,2273
  rectangle net PRI_1: 365,1958 681,2276
  rectangle net AC2: -75,783 133,1064
  rectangle net AC2: 20,783 133,1423
  rectangle net BR#: -236,781 -87,1423
  rectangle net PRI_1: 333,1159 441,1221
  rectangle net GND: 589.67,51 630.67,151.62
  rectangle net 3V3: 527.67,107.62 581.67,151.62
  rectangle net 3V3: 481.67,177.62 581.67,255.62
  rectangle net 3V3: 481.67,107.62 555.67,255.62
  region net PRI_2: 380,537 380,689 360,689 360,537
  region net PRI_2: 380,658 380,689 159,689 159,658
  region net PRI_2: 360,555 360,537 578,537 578,555
  region net BYP#: 391,584 391,566 607,566 607,584
  region net PRI_2: 578,405 578,544 558,544 558,405
  region net BYP#: 608,426 608,584 588,584 588,426
  region net PRI_2: 184,670 184,942 159,942 159,670
  region net PRI_2: 1017,397 1017,415 558,415 558,397
  region net BYP#: 962,422 962,440 588,440 588,422
  region net PRI_2: 1030,397 1030,871 1006,871 1006,397
  region net PRI_2: 1030,816 1030,905 916,905 916,816
  region net BYP#: 997,422 997,564 936,564 936,422
  region net GND_VAC: 638,593 638,773 520,773 520,593
  region net GND_VAC: 835,740 835,1033 788,1033 788,740
  region net GND_VAC: 958,1026 958,1165 780,1165 780,1026
  region net GND_VAC: 1155,963 1155,1165 945,1165 945,963
  region net GND_VAC: 653,1037 653,1165 529,1165 529,1037
  region net GND_VAC: 797,449 797,1165 618,1165 618,449
  region net PW_: 998,575 998,728 915,728 915,575
  region net PW_: 926,447 926,728 810,728 810,447
  region net FB_: 997,741 997,805 847,805 847,741
  region net FB_: 935,917 935,998 903,998 903,917
  region net FB_: 907,741 907,998 847,998 847,741
  region net FB_: 997,917 997,951 847,951 847,917
  region net NetD3_1: 596,922 596,1021 530,1021 530,922
  region net NetD3_1: 596,909 596,955 466,955 466,909
  region net BYP#: 596,784 596,901 464,901 464,784
  region net BYP#: 501,565 501,873 389,873 389,565
  region net NetCF1_1: 455,882 455,967 333,967 333,882
  region net NetCF1_1: 380,707 380,894 196,894 196,707
  region net PRI_2: 324,920 324,1165 159,1165 159,920
  region net PRI_1: 456,982 456,1027 430,1027 430,982
  region net PRI_3: 478,1036 478,1165 453,1165 453,1036
  region net PRI_3: 519,963 519,1165 466,1165 466,963
  region net PRI_1: 442,982 442,1165 333,1165 333,982
  region net GND: 1244,1219 1244,1261 452,1261 452,1219
  region net GND: 955,1233 955,1407 931,1407 931,1233
  region net GND: 955,1391 955,1701 903,1701 903,1391
  region net OPT_: 924,1268 924,1380 847,1380 847,1268
  region net OPT_: 895,1268 895,1701 847,1701 847,1268
  region net GND: 833,1253 833,1351 452,1351 452,1253
  region net QOUT: 895,1823 895,1875 815,1875 815,1823
  region net QOUT: 833,1691 833,1875 767,1875 767,1691
  region net GND: 757,1724 757,1918 588,1918 588,1724
  region net VOUT: 1092,1823 1092,1875 902,1875 902,1823
  region net VOUT: 1103,1643 1103,1875 1065,1875 1065,1643
  region net NetD2_1: 1055,1714 1055,1813 846,1813 846,1714
  region net VOUT: 1103,1369 1103,1701 962,1701 962,1369
  region net QOUT: 834,1362 834,1567 628,1567 628,1362
  region net QOUT: 833,1512 833,1703 457,1703 457,1512
  region net GND: 616,1303 616,1497 452,1497 452,1303
  region net QOUT: 580,1675 580,1917 239,1917 239,1675
  region net PRI_4: 441,1360 441,1660.6 236,1660.6 236,1360
  rectangle net VBUS: 1490,380 1559,664
  rectangle net VBUS: 1465,327 1523,664
  rectangle net GND: -237,415 131,767
  rectangle net GND: 604,2352 756,2509
  rectangle net #OUT_MIC: 1740,428 1868,528
  rectangle net NetR6_1: 1731,560 1864,596.2
  rectangle net 3V3: 1931,429 1970,506
  rectangle net GND: 2002,1149 2041,1374
  rectangle net 3V3: 1920,634 2062,764
  rectangle net GND: 1788,24 1895,65
  rectangle net NetC8_2: 2015,419 2174,482
  rectangle net #_OUT_MIC: 1926,344 2068,385
  rectangle net NetC9_2: 1640,431 1700,595
  region net GND: 1330,205 1330,245 1186,245 1186,205
Bottom Layer:
  rectangle net 3V3: 2191,61 2237,102
  rectangle net 3V3: 1949,1 2237,64
  rectangle net GND_VAC: 294,1051 764,1130
  rectangle net GND_VAC: 232,1051 325,2169
  rectangle net PRI_1: 365,1393 441,2026
  rectangle net PRI_1: 361,2008 682,2103
  rectangle net PRI_1: 333,1196.25 440,1407
  rectangle net PRI_1: 333,1143 440,1286
  rectangle net GND_VAC: 729,1050 953,1318
  rectangle net VOUT: 143,342 1209,413
  rectangle net VOUT: 30,397 1187,447
  region net VOUT: 1122.07,405.25 1169.33,355.59 1267.5,449 1220.24,498.66
  rectangle net VOUT: 1188,449 1267.5,1245.43
  region net VOUT: 1041.03,1379.11 1220.75,1198.83 1267.5,1245.43 1087.78,1425.71
  rectangle net VOUT: 962,1323 1100,1576
  rectangle net GND: 916,1868 1056,2003
  rectangle net GND: 448,1868 925,2001
  rectangle net GND: 448,1399 618,2001
  rectangle net GND_VAC: -228,2112 790,2272
  rectangle net VBUS: 709,257 860,300
  rectangle net VBUS: 663,172 718,325
  rectangle net VBUS: 69,151 719,206
  rectangle net VBUS: 69,153 130,385
  rectangle net VBUS: 663,293 1002,329
  rectangle net VBUS: 987,117 1075,329
  rectangle net VIN: 868,237.6 941,286
  rectangle net VIN: 727,52 941,249
  rectangle net GND: 1185,146 1354,243
  rectangle net VBUS: 986,129 1178,184
  rectangle net GND: 1331,287 1403,485
  rectangle net GND: 1271,146 1432,301
  rectangle net VBUS: 986,91 1502,137
  region net 3V3: 1513.88,34.51 1531.11,15.03 1571.23,50.53 1554,70
  rectangle net 3V3: 1550.98,29 1591,66.78
  region net 3V3: 1550.98,66.78 1613.18,4.04 1706.2,96.27 1644,159
  rectangle net 3V3: 1644,35 1717,159
  rectangle net 3V3: 481,2 1717,42
  rectangle net GND: 406,50 718,140
  rectangle net BR#: -236,781 -87,986
  rectangle net AC2: -79,825 134,971
  rectangle net AC1: -240,1080 134,1227
  rectangle net IO_4#: 1662,1619.2 1834,1671.2
  rectangle net 3V3: 1662,1694 1794,1746
  rectangle net IO_4: 1517,1645 1628,1716
  rectangle net CHG: 1152,1595 1232,1635
  rectangle net GND: 1271,220 1423,274
  rectangle net SOFT_P: 842,2355 899.63,2506
  rectangle net GND: 752,2426 814,2506
  region net VOUT: 58,284 58,447 -236,447 -236,284
  rectangle net BATT_IN: 382,2319 523,2509
  rectangle net GND: 552,2351 752,2506
  rectangle net 3V3: 1840,102 1948,167
  rectangle net VBUS: 1457,392 1555,424
  rectangle net #_OUT_MIC: 1682,1394 1724,1539
  rectangle net #_OUT_MIC: 1600,1407 1724,1551
  rectangle net GND: 1375,146 1432,485
  rectangle net GND: 1376,192 1416,344
  rectangle net VBUS: 1449,93 1502,435.6

## Silkscreen, mask and mechanical layers (free items; w line width, h text height)
Top Overlay:
  rectangle: 1769,4 1950,13
  rectangle: 1916,4 1950,116
  rectangle: 1945,4 1974,159
  text "# > 0.1uF 0805" at 1966,2447.3 h60
  text "* > 10K 0805" at 1966,2385 h60
  text "*" at 1077,2009 h50
  text "JTAG" at 2211,1654 h65
  text "*" at 2348,1530 h50
  text "*" at 1341,1324 h50
  text "*" at 2056,1324 h50
  text "#" at 2090,1238 h50
  text "AC INPUT" at -235,1230 h65 r270
  text "*" at 2344,1199 h50
  text "*" at 2056,1150 h50
  text "*" at 1341,1137 h50
  text "TX" at 2315,997 h60
  text "RX" at 2313,867 h60
  text "STATUS LED" at 1250.35,809 h50
  text "B_ADC" at 2204,742 h60
  text "#O_MIC" at 1615,736 h60
  text "#" at 2039,689 h50
  text "AC OUTPUT" at -235,670 h65 r270
  text "GND" at 2268,606 h60
  text "3V3" at 2291,477 h60
  text "VBUS" at 1306,456 h60
  text "VOUT" at 231,350 h60
  text "#" at 1292,340 h50
  text "#" at 753,295 h50
  text "#" at 362,119 h50
  text "*" at 661,20 h50
  text "Mic Area" at 1518,4 h50
Bottom Overlay:
  drawing of 3082 lines, arcs and shapes, not listed
  text "# > 0.1uF 0805" at 2350,2447.3 h60
  text "#" at 904,2438 h50
  text "#" at 644,2436 h50
  text "* > 10K 0805" at 2350,2385 h60
  text "*" at 937,2363 h50
  text "#" at 1454,2139 h50
  text "*" at 1776,1750 h50
  text "*" at 1424,1655 h50
  text "ZERO CARBON FOOTPRINT" at 2173,658.26 h38
  text "#" at 1553,601 h50 r180
  text "*" at 1742,460 h50
  text "#" at 1935,276 h50
  text "*" at 1745,261 h50
  text "*" at 1316,173 h50
  text "#" at 2173,160 h50 r90
  text "*" at 2054,149 h50
  text "*" at 1981,146 h50
  text "#" at 1459,127 h50
  text "#" at 1798,64 h50
Mechanical 13:
  lines w10: -241.16,230.28 -241.16,2286.03 -1,2286.03 -1,2518 389,2518 1088,2518 1211,2518 1211,2263 1941,2263 1941,2518 2514.98,2518 2514.98,-1.68 -1,-1.69 -1,230.28 -241.16,230.28

## Dimensions
2514.98,2518 to -241.16,2286.03 on Mechanical 1
-241.16,2286.03 to -241.16,230.28 on Mechanical 1
389,2518 to -1,2286.03 on Mechanical 1
2396.87,2419.26 to 117.11,2419.26 on Mechanical 1
2396.87,96.43 to 2396.87,2419.26 on Mechanical 1
117.11,96.43 to -1,-1.68 on Mechanical 1
117.11,96.43 to -1,-1.69 on Mechanical 1
2514.98,2518 to -1,2518 on Mechanical 1
2514.98,2518 to 2514.98,-1.68 on Mechanical 1